# Altium PCB DominicMcNulty_Car_PCB_Group26.PcbDoc
Units mm, origin at the board's own origin, x right, y up, seen from the top; angles counter-clockwise.
Board outline 64 x 85 mm, 4 copper layers (Top Layer, Ground Plane, Power Plane, Bottom Layer), stack 0.844 mm thick; 98 components, 60 nets, 296 pads, 64 vias.
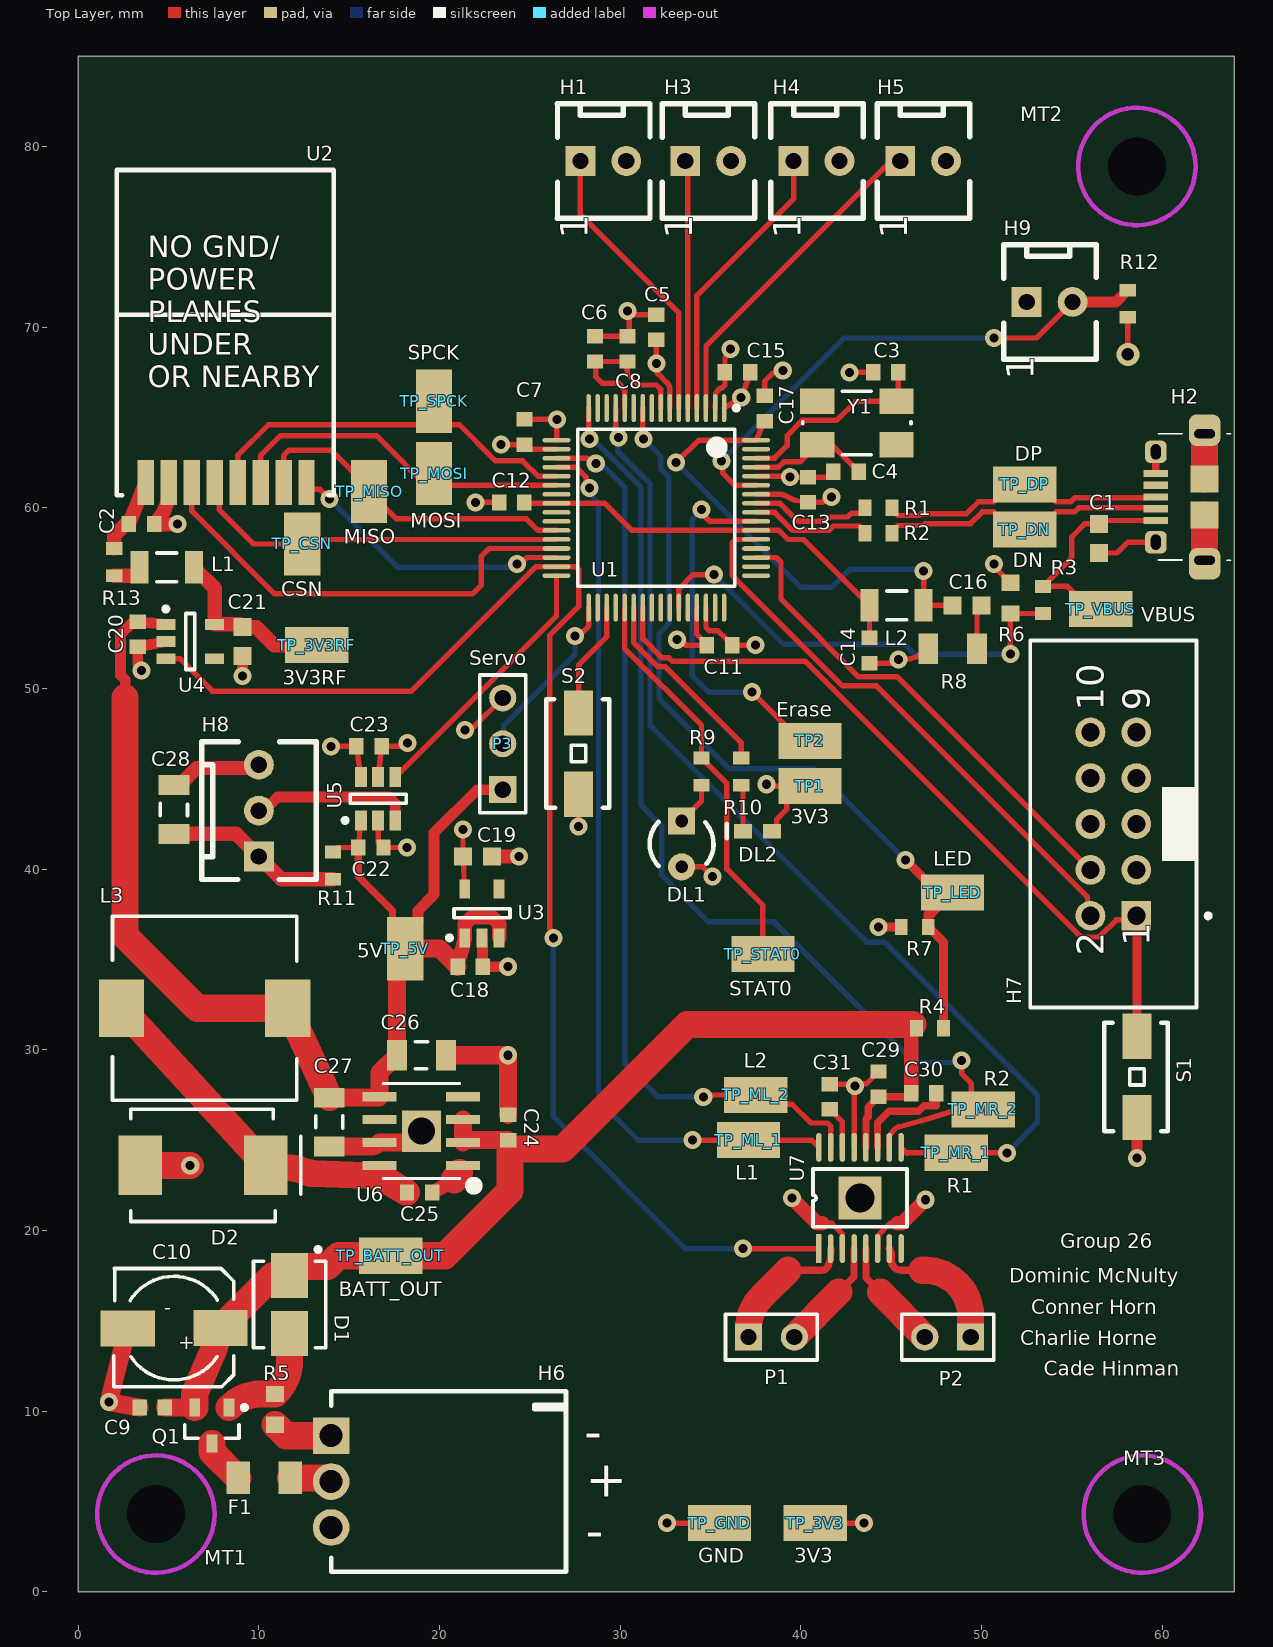
[diagram p0: Top Layer view]
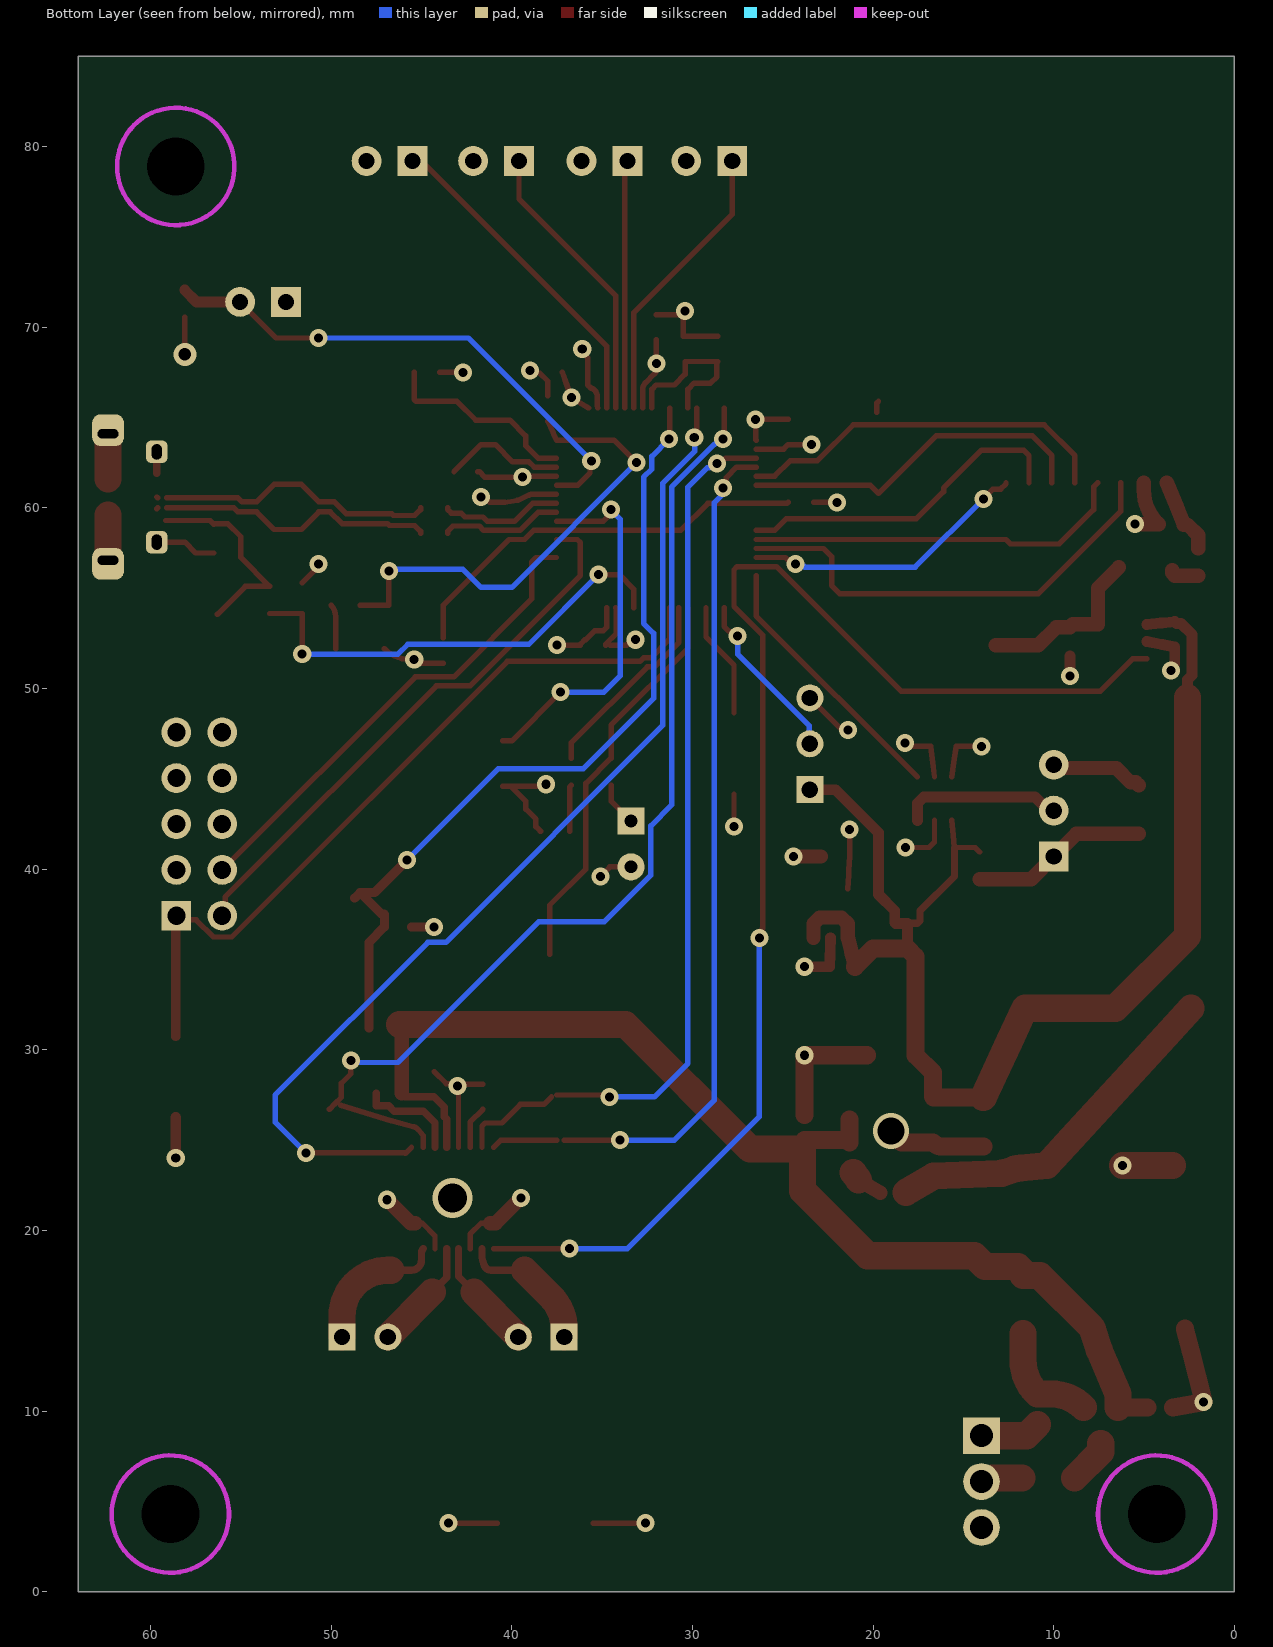
[diagram p1: Bottom Layer view, seen from below]
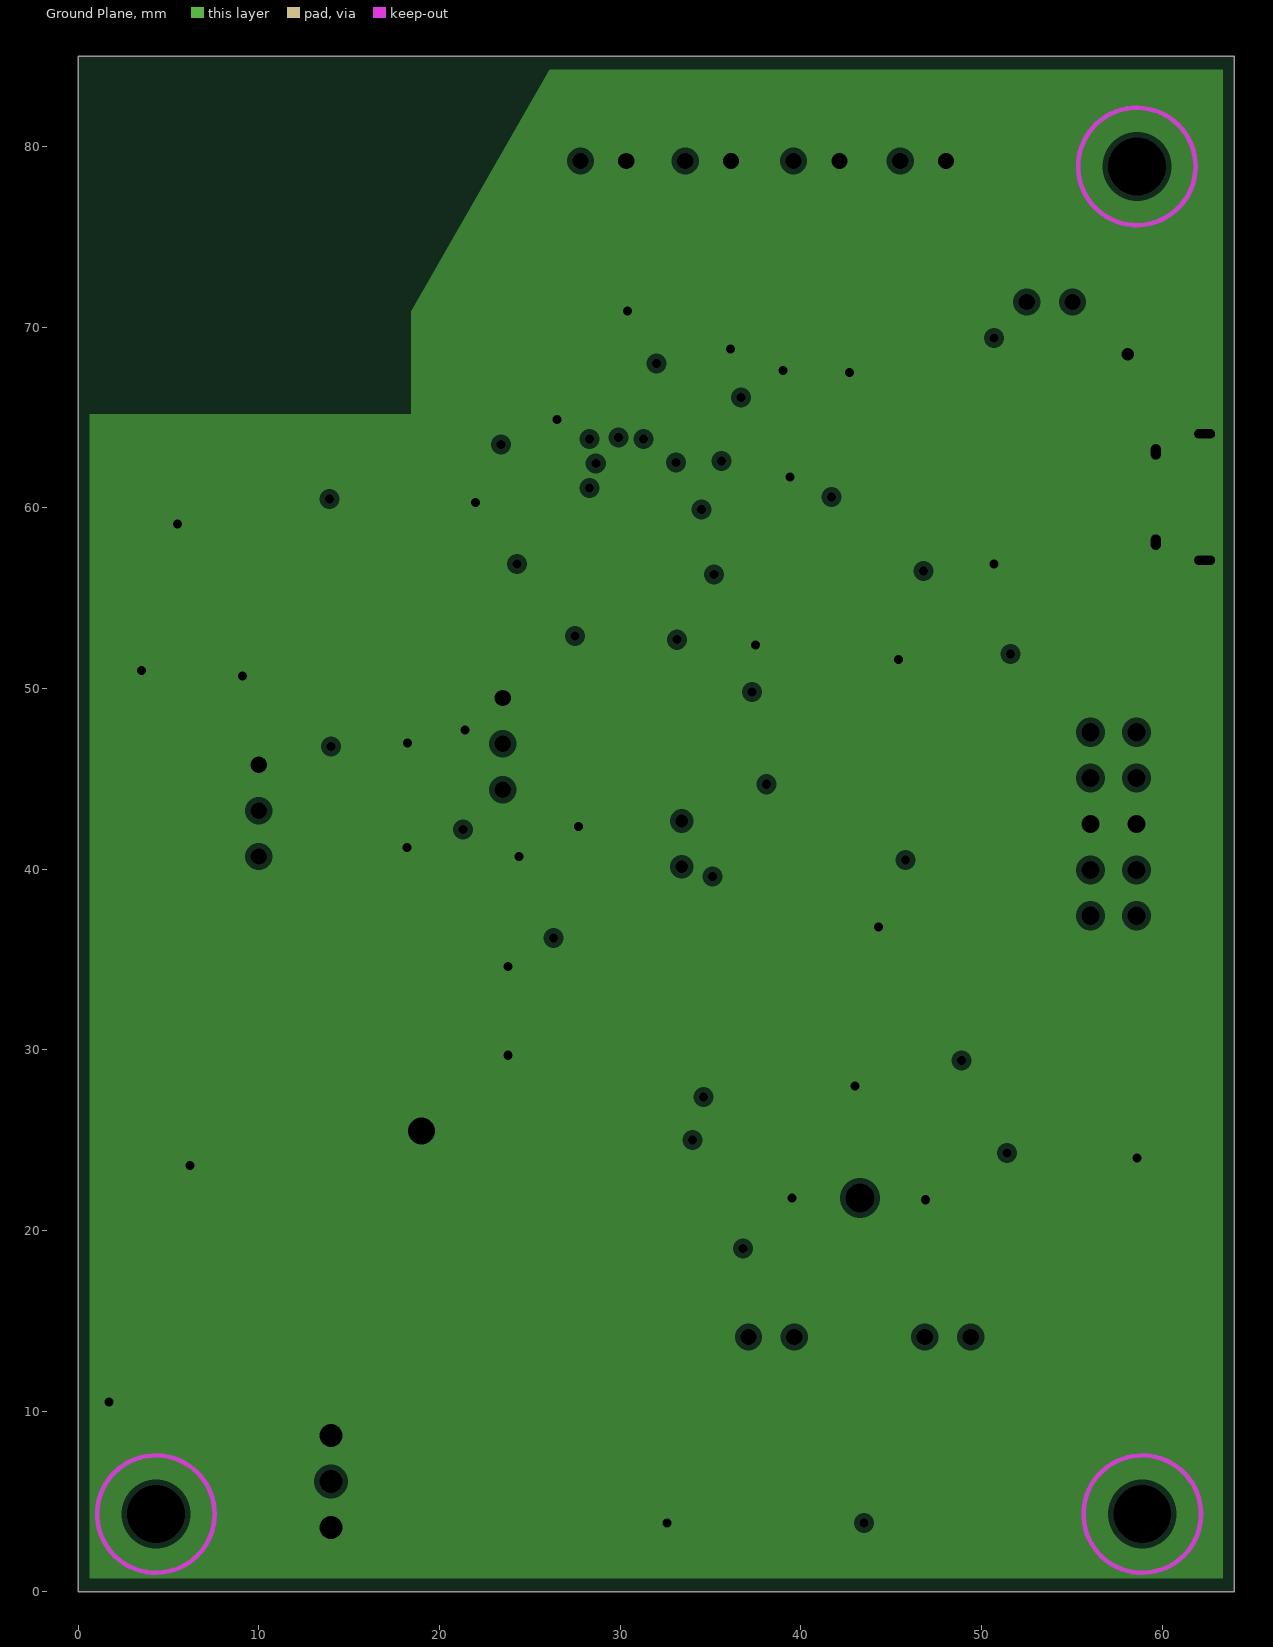
[diagram p2: Ground Plane, clearances drawn from the general rule]
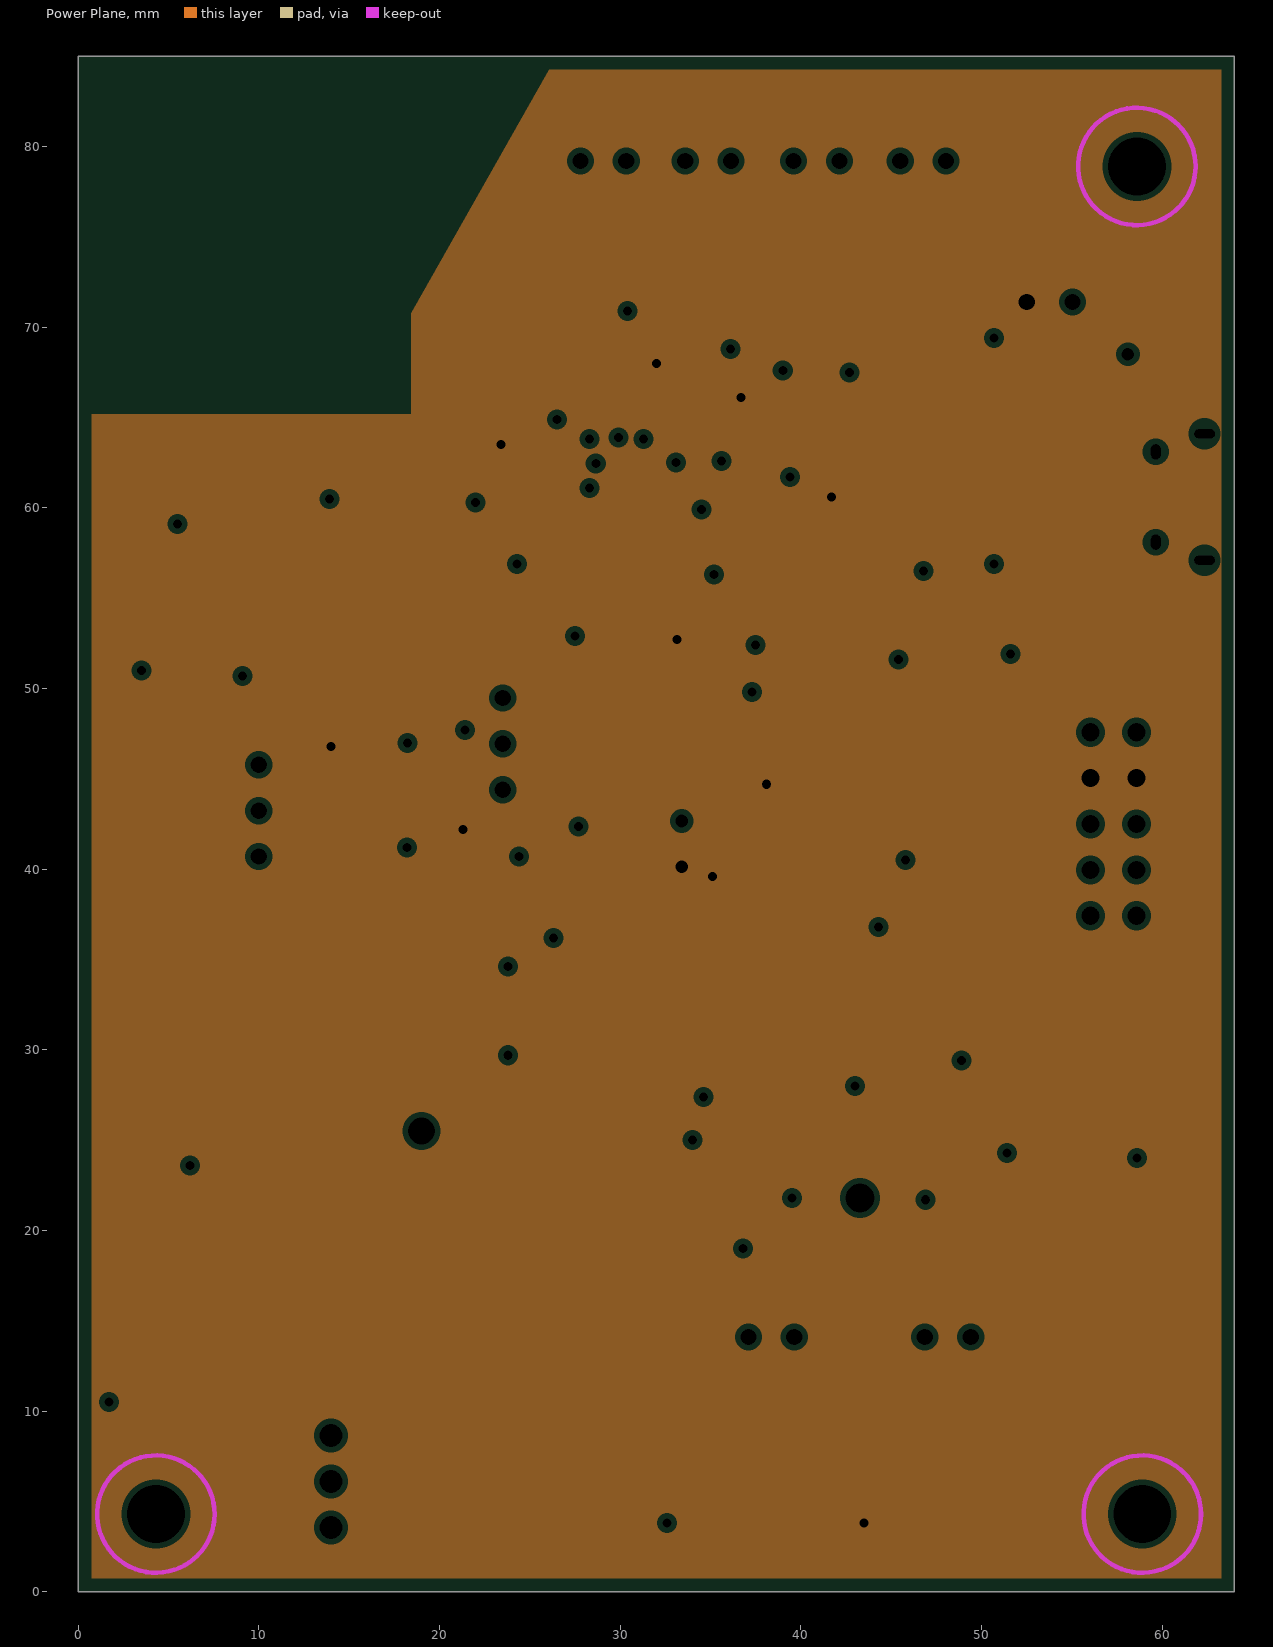
[diagram p3: Power Plane, clearances drawn from the general rule]

## Layer stack, top to bottom
Top Solder: solder mask 0.0102, Solder Resist, Dk 3.5
Top Layer: signal copper 0.0356
Dielectric 1: core 0.32, FR-4, Dk 4.8
Ground Plane: plane copper 0.036, net GND
Dielectric 3: prepreg 0.127, Dk 4.2
Power Plane: plane copper 0.036, net 3V3
Dielectric 4: core 0.254, Dk 4.2
Bottom Layer: signal copper 0.0356
Bottom Solder: solder mask 0.0102, Solder Resist, Dk 3.5

## Board outline
0,85 64,85 64,0 0,0 0,85

## Design rules (kind name [scope] priority, off if disabled: settings)
BoardOutlineClearance [All] p1: gap=0.5 ignorepadtopadclearanceinfootprint=FALSE
Clearance GND_POLY [InNamedPolygon('GND')] p1: gap=0.254 ignorepadtopadclearanceinfootprint=FALSE
Clearance Min_Clearance_Circuit_Labs [All] p2: gap=0.2 ignorepadtopadclearanceinfootprint=FALSE
DiffPairsRouting [All] p1: maxlimit=0.254 minlimit=0.2 mostfreqgap=0.254 toplayer_minwidth=0.254 toplayer_maxwidth=0.381 toplayer_prefwidth=0.381 bottomlayer_minwidth=0.254 bottomlayer_maxwidth=0.381 bottomlayer_prefwidth=0.381 maxuncoupledlength=12.7
FanoutControl Fanout_BGA [IsBGA] p1 off: bgadir=Out bgaviamode=Centered fanoutstyle=Auto fanoutdirection=Alternating viagrid=0.025 // Fanout_BGA (Default Rule)
Height [All] p1: minheight=0 maxheight=50.8 prefheight=12.7
HoleSize [All] p1: absolutevalues=TRUE maxlimit=10 minlimit=0.3 maxpercent=80.000 minpercent=20.000
MinimumAnnularRing [All] p1: minimumring=0.1
MinimumSolderMaskSliver [All] p1: minsoldermaskwidth=0.102
NetAntennae [All] p1: netantennaetolerance=1
PlaneClearance [All] p1: clearance=0.305
PlaneConnect [All] p1: planeconnectstyle=Direct reliefexpansion=0.508 reliefentries=4 reliefconductorwidth=0.254 reliefairgap=0.254
PolygonConnect [All] p1: connectstyle=Relief reliefconductorwidth=0.305 reliefentries=4 polygonreliefangle="90 Angle" airgapwidth=0.254
RoutingVias [All] p1: holewidth=0.5 width=1 viastyle="Through Hole" minholewidth=0.3 minwidth=0.8 maxholewidth=1 maxwidth=2
SMDNeckDown [All] p1 off: percent=50.000
SMDToCorner [All] p1: distance=98425
SMDToPlane [All] p1: distance=1968504
SilkToSolderMaskClearance SilkscreenOverComponentPads [IsPad] p1: minsilkscreentomaskgap=0.2 clearancetoexposedcopper=TRUE
SolderMaskExpansion [All] p1: expansion=0.102 istentingtop=FALSE
ViasUnderSMD [All] p1: allowed=FALSE
Width [All] p1: maxlimit=2 minlimit=0.2 preferedwidth=0.3
21 further rules are at their usual default settings.

## Classes and differential pairs
component class Schematic_Car_Secondary: C29 C30 C31 H9 P1 P2 P3 R12 TP_3V3 TP_3V3RF TP_5V TP_BATT_OUT TP_CSN TP_DN TP_DP TP_GND TP_LED TP_MISO TP_ML_1 TP_ML_2 TP_MOSI TP_MR_1 TP_MR_2 TP_SPCK TP_STAT0 TP_VBUS U7
component class Schematic_Car_Main: C1 C2 C3 C4 C5 C6 C7 C8 C9 C10 C11 C12 C13 C14 C15 C16 C17 C18 C19 C20 C21 C22 C23 C24 C25 C26 C27 C28 D1 D2 DL1 DL2 F1 H1 H2 H3 H4 H5 H6 H7 H8 L1 L2 L3 MT1 MT2 MT3 Q1 R1 R2 R3 R4 R5 R6 R7 R8 R9 R10 R11 R13 S1 S2 TP1 TP2 U1 U2 U3 U4 U5 U6 Y1
differential pair D: +D_P -D_N

## Components (designator, comment, footprint, x,y, rotation, side; value= is the part's Value field where it differs from the comment)
C1 "4.7uF" CAPC1608N 56.5,58.3 r270 top
C2 "10uF" CAPC1608L 3.5,59.1 r180 top
C3 "27pF" CAPC1608L 44.7,67.5 r0 top
C4 "27pF" CAPC1608L 42.5,62 r0 top
C5 "100nF" CAPC1608L 32,70 r270 top
C6 "100nF" CAPC1608L 28.6,68.8 r270 top
C7 "100nF" CAPC1608L 24.7,64.2 r270 top
C8 "100nF" CAPC1608L 30.4,68.8 r270 top
C9 "100nF" CAPC1608L 4.1,10.2 r0 top
C10 "100uF/16V" NICH-1 5.3,14.6 r0 top
C11 "100nF" CAPC1608L 35.5,52.4 r180 top
C12 "100nF" CAPC1608L 24,60.3 r0 top
C13 "100nF" CAPC1608L 40.4,61 r270 top
C14 "100nF" CAPC1608L 43.8,52.1 r90 top
C15 "100nF" CAPC1608L 36.5,67.5 r0 top
C16 "4.7uF" CAPC1608N 49.2,54.6 r180 top
C17 "100nF" CAPC1608L 38,65.5 r270 top
C18 "1uF" CAPC1608L 21.7,34.6 r180 top
C19 "4.7uF" CAPC1608N 22.1,40.7 r180 top
C20 "1uF" CAPC1608L 3.3,53 r90 top
C21 "4.7uF" CAPC1608N 9.1,52.6 r90 top
C22 "1uF" CAPC1608L 16.2,41.2 r180 top
C23 "1uF" CAPC1608L 16.1,46.8 r180 top
C24 "10uF" CAPC1608L 23.8,25.7 r270 top
C25 "100nF" CAPC1608L 18.9,22.1 r0 top
C26 "22uF" CAPC3216L 19,29.7 r180 top
C27 "22uF" CAPC3216L 13.9,26 r90 top
C28 "22uF" CAPC3216L 5.3,43.3 r270 top
C29 "10uF" CAPC1608L 44.3,28.1 r90 top
C30 "10nF" CAPC1608L 46.8,27.6 r180 top
C31 "2.2uF" CAPC1608L 41.6,27.4 r270 top
D1 "DIODE ZENER 5.6V" DO-214AA_SCL 11.7,15.9 r270 top
D2 "MBRS330T3G 30V 4A" SMC 6.9,23.6 r0 top
DL1 "DL_LED3mm" LED3MMTH 33.4,41.4 r270 top
DL2 "Green" WL-SMCW0603 36.8,42.1 r0 top
F1 "5A" RESC3216N 10.3,6.3 r180 top
H1 "2 Pin Molex KK HDR" MOLEX_KK_2_HDR 27.8,79.2 r0 top
H2 "JS_USB_MICRO_B" FCI_USB_10118194-0001LF 63.8,60.6 r90 top
H3 "2 Pin Molex KK HDR" MOLEX_KK_2_HDR 33.6,79.2 r0 top
H4 "2 Pin Molex KK HDR" MOLEX_KK_2_HDR 39.6,79.2 r0 top
H5 "2 Pin Molex KK HDR" MOLEX_KK_2_HDR 45.5,79.2 r0 top
H6 "Battery_HEADER_3pin" BATT_HEADER_3POS 14,6.1 r270 top
H7 "Header 5X2 Vert" IDC2.54-V10D 57.3,42.5 r90 top
H8 "3 Pin Molex KK Hdr" MOLEX_KK_3_HDR 10,40.7 r90 top
H9 "2 Pin Molex KK HDR" MOLEX_KK_2_HDR 52.5,71.4 r0 top
L1 "1A max, Idc 0.3R," INDC3216L 4.9,56.7 r0 top
L2 "1A max, Idc 0.3R," INDC3216L 45.3,54.6 r180 top
L3 "IND 5.2UH 6A" INDUCTOR5u2 7,32.3 r0 top
MT1 "M3.2 NPTH" MNT-HOLE_3.2mm_NPTH 4.3,4.3 r0 top
MT2 "M3.2 NPTH" MNT-HOLE_3.2mm_NPTH 58.6,78.9 r0 top
MT3 "M3.2 NPTH" MNT-HOLE_3.2mm_NPTH 58.9,4.3 r0 top
P1 "JA_PIN_Header 2" HDR1X2 37.1,14.1 r0 top
P2 "JA_PIN_Header 2" HDR1X2 49.4,14.1 r180 top
P3 "Servo" HDR1X3 23.5,44.4 r90 top
Q1 "SSM3J328R,LF" SOT23_L 7.4,9.2 r270 top
R1 "27R" RESC1608L 44.3,60 r180 top
R2 "27R" RESC1608L 44.3,58.6 r180 top
R3 "27K" RESC1608L 53.4,54.9 r90 top
R4 "300K" RESC1608L 47.15,31.2 r180 top
R5 "47K" RESC1608N 10.9,10.1 r90 top
R6 "47K" RESC1608N 51.6,55 r270 top
R7 "220K" RESC1608L 46.3,36.8 r0 top
R8 "1R" RESC3216L 48.4,52.2 r0 top
R9 "3K" RESC1608L 34.5,45.4 r90 top
R10 "2K" RESC1608L 36.7,45.4 r90 top
R11 "0R" RESC1608L 14.1,40.2 r90 top
R12 "100K" RESC1608L 58.1,71.3 r90 top
R13 "10R" RESC1608L 2,57 r270 top
S1 "EVQPNF05M" EVQPNF05M 58.6,28.5 r90 top
S2 "EVQPNF05M" EVQPNF05M 27.7,46.4 r90 top
TP1 "3V3" TP_1206 40.5,44.6 r0 top value=TP
TP2 "Erase" TP_1206 40.5,47.1 r0 top value=TP
TP_3V3 "3V3" TP_1206 40.8,3.8 r180 top value=TP
TP_3V3RF "3V3RF" TP_1206 13.2,52.4 r180 top value=TP
TP_5V "5V" TP_1206 18.1,35.6 r90 top value=TP
TP_BATT_OUT "BATT_OUT" TP_1206 17.3,18.6 r180 top value=TP
TP_CSN "CSN" TP_1206 12.4,58 r270 top value=TP
TP_DN "DN" TP_1206 52.4,58.8 r180 top value=TP
TP_DP "DP" TP_1206 52.4,61.3 r180 top value=TP
TP_GND "GND" TP_1206 35.5,3.8 r180 top value=TP
TP_LED "LED" TP_1206 48.4,38.7 r180 top value=TP
TP_MISO "MISO" TP_1206 16.1,60.9 r270 top value=TP
TP_ML_1 "L1" TP_1206 37.1,25 r0 top value=TP
TP_ML_2 "L2" TP_1206 37.5,27.5 r0 top value=TP
TP_MOSI "MOSI" TP_1206 19.7,61.9 r270 top value=TP
TP_MR_1 "R1" TP_1206 48.6,24.3 r0 top value=TP
TP_MR_2 "R2" TP_1206 50.1,26.7 r0 top value=TP
TP_SPCK "SPCK" TP_1206 19.7,65.9 r270 top value=TP
TP_STAT0 "STAT0" TP_1206 37.9,35.3 r180 top value=TP
TP_VBUS "VBUS" TP_1206 56.6,54.4 r180 top value=TP
U1 "ATSAM4S8BA-ANR" LQFP64_L 32,60 r270 top locked
U2 "nRF24 SMD" NRF24 2.143,60.7 r0 top
U3 "CAT6219-330TDGT3" SOT95P280X145-5N 22.35,37.55 r90 top
U4 "CAT6219-330TDGT3" SOT95P280X145-5N 6.2,52.6 r0 top
U5 "SN74LVC1T45" SOT23-6_N 16.6,43.9 r90 top
U6 "ADP2302ARDZ-5.0 BUCK" RD_8_1 19,25.5 r180 top locked value=Value
U7 "DRV8833" "HTSOP16 DRV8833" 41,19 r90 top locked
Y1 "12MHz" 6.0X3.5-4 43.1,64.7 r0 top

## Footprints (in the part's own frame and the unit in brackets; to place one, negate y for a bottom-side part, rotate by r counter-clockwise, add the part's x,y. Pads: shape width x height; smd on the part's side, far side on the other; paste and mask are expansions set on the pad)
6.0X3.5-4 [mm] "4 SMD 6.0X3.5 mm No Lead Crystal"
  rect 1.9x1.4 smd: 1(-2.2,-1.2) 2(2.2,-1.2) 3(2.2,1.2) 4(-2.2,1.2)
  silkscreen extent -3,-1.75 3,1.75, body extent -3,-1.75 3,1.75, height 1.2
BATT_HEADER_3POS [mil]
  rect 80x80 hole 50: 1(-100,0)
  round 80 hole 50: 2(0,0) 3(100,0)
  silkscreen extent -197,0 197,512, body extent -197,-31 200,504, height 294
CAPC1608L [mm] "Chip Capacitor, Body 1.6x0.8mm, IPC High Density"
  rect 0.8x0.9 smd: 1(-0.7,0) 2(0.7,0)
  body extent -0.87,-0.48 0.87,0.48, height 0.85
CAPC1608N [mm] "Chip Capacitor, Body 1.6x0.8mm, IPC Medium Density"
  rect 1x1 smd: 1(-0.8,0) 2(0.8,0)
  body extent -0.87,-0.48 0.87,0.48, height 0.85
CAPC3216L [mm] "Chip Capacitor, Body 3.2x1.6mm, IPC High Density"
  rect 1.1x1.7 smd: 1(-1.35,0) 2(1.35,0)
  silkscreen extent -0.35,-0.75 0.35,0.75, body extent -1.7,-0.9 1.7,0.9, height 1.35
DO-214AA_SCL [mm] "Molded Diode, 2-Leads, Body 4.40x3.62mm, IPC Medium Density"
  rect 2.5x2.05 smd: 1(-1.6,0) 2(1.6,0)
  silkscreen extent -3.17,-2 2.4,2
EVQPNF05M [mm] "Panansonic light touch SMD push button switch"
  rect 2.5x1.6 smd: 1(-2.25,0) 2(2.25,0)
  silkscreen extent -3,-1.7 3,1.8, body extent -3,-1.7 3,1.8, height 5
FCI_USB_10118194-0001LF [mm] "Micro USB B Type Receptacle"
  rect 0.4x1.35 smd mask+0.07: 1(-1.3,4.15) 2(-0.65,4.15) 3(0,4.15) 4(0.65,4.15) 5(1.3,4.15)
  rrect50% 1.75x1.75 hole 0.5 slot 1.15 at 90 deg copper offset -0.2,0 paste-2539.97 mask+0.1: 6(-3.5,1.45)
  rrect50% 1.25x1.2 hole 0.55 slot 0.85 at 0 deg: 6(-2.5,4.15) 6(2.5,4.15)
  rect 1.5x1.55 smd: 6(-1,1.45) 6(1,1.45)
  rrect50% 1.75x1.75 hole 0.5 slot 1.15 at 90 deg copper offset 0.2,0 paste-2539.97 mask+0.1: 6(3.5,1.45)
  silkscreen extent -3.5,0 3.5,4
HDR1X2 [mm] "Connector; Header; 2 Position"
  rect 1.5x1.5 hole 0.9: 1(0,0)
  round 1.5 hole 0.9: 2(2.54,0)
  silkscreen extent -1.27,-1.27 3.81,1.27, body extent -1.25,-1.25 3.79,1.25, height 8.54
HDR1X3 [mm] "Connector; Header; 3 Position"
  rect 1.5x1.5 hole 0.9: 1(0,0)
  round 1.5 hole 0.9: 2(2.54,0) 3(5.08,0)
  silkscreen extent -1.27,-1.27 6.35,1.27, body extent -1.27,-1.27 6.35,1.27, height 8.89
"HTSOP16 DRV8833" [mm]
  rect 1.6x0.3 smd: 1(0,0)
  oval 1.6x0.3 smd: 2(0,-0.65) 3(0,-1.3) 4(0,-1.95) 5(0,-2.6) 6(0,-3.25) 7(0,-3.9) 8(0,-4.55) 9(5.6,-4.55) 10(5.6,-3.9) 11(5.6,-3.25) 12(5.6,-2.6) 13(5.6,-1.95) 14(5.6,-1.3) 15(5.6,-0.65) 16(5.6,0)
  rect 2.4x2.4 smd: 17(2.8,-2.275)
  silkscreen extent 1.2,-4.88 4.4,0.33, body extent -0.4,-4.77 6,0.23, height 1.13
IDC2.54-V10D [mm] "Connector; IDC, Low Profile Male Header, Thru-Hole; 10 Position; Vertical; Pitch 2.54 mm; Body 20.32 x 9.2 x 9.45 mm (LxWxH)"
  rect 1.65x1.65 hole 1: 1(-5.08,-1.27)
  round 1.65 hole 1: 2(-5.08,1.27) 3(-2.54,-1.27) 4(-2.54,1.27) 5(0,-1.27) 6(0,1.27) 7(2.54,-1.27) 8(2.54,1.27) 9(5.08,-1.27) 10(5.08,1.27)
  silkscreen extent -10.16,-5.38 10.16,4.6, body extent -10.16,-4.6 10.16,4.6, height 9.45
INDC3216L [mm] "Chip Inductor, Body 3.2x1.6mm, IPC High Density"
  rect 1x1.8 smd: 1(-1.5,0) 2(1.5,0)
  silkscreen extent -0.55,-0.8 0.55,0.8, body extent -1.75,-0.95 1.75,0.95, height 1.9
INDUCTOR5u2 [mm]
  rect 2.5x3.2 smd: 1(-4.6,0) 2(4.6,0)
  silkscreen extent -5.1,-5.1 5.1,5.1, body extent -5,-5 5,5, height 3.8
LED3MMTH [mm] "LED 3 mm Through Hole"
  rect 1.5x1.5 hole 0.7: 1(-1.27,0)
  round 1.5 hole 0.7: 2(1.27,0)
  silkscreen extent -1.22,-1.77 1.22,1.77
LQFP64_L [mm] "Thin QFP, 64-Leads, Body 10x10mm, Pitch 0.5mm, IPC High Density"
  oval 1.55x0.25 smd mask+0.07: 1(-5.525,3.75) 2(-5.525,3.25) 3(-5.525,2.75) 4(-5.525,2.25) 5(-5.525,1.75) 6(-5.525,1.25) 7(-5.525,0.75) 8(-5.525,0.25) 9(-5.525,-0.25) 10(-5.525,-0.75) 11(-5.525,-1.25) 12(-5.525,-1.75) 13(-5.525,-2.25) 14(-5.525,-2.75) 15(-5.525,-3.25) 16(-5.525,-3.75) 33(5.525,-3.75) 34(5.525,-3.25) 35(5.525,-2.75) 36(5.525,-2.25) 37(5.525,-1.75) 38(5.525,-1.25) 39(5.525,-0.75) 40(5.525,-0.25) 41(5.525,0.25) 42(5.525,0.75) 43(5.525,1.25) 44(5.525,1.75) 45(5.525,2.25) 46(5.525,2.75) 47(5.525,3.25) 48(5.525,3.75)
  oval 0.25x1.55 smd mask+0.07: 17(-3.75,-5.525) 18(-3.25,-5.525) 19(-2.75,-5.525) 20(-2.25,-5.525) 21(-1.75,-5.525) 22(-1.25,-5.525) 23(-0.75,-5.525) 24(-0.25,-5.525) 25(0.25,-5.525) 26(0.75,-5.525) 27(1.25,-5.525) 28(1.75,-5.525) 29(2.25,-5.525) 30(2.75,-5.525) 31(3.25,-5.525) 32(3.75,-5.525) 49(3.75,5.525) 50(3.25,5.525) 51(2.75,5.525) 52(2.25,5.525) 53(1.75,5.525) 54(1.25,5.525) 55(0.75,5.525) 56(0.25,5.525) 57(-0.25,5.525) 58(-0.75,5.525) 59(-1.25,5.525) 60(-1.75,5.525) 61(-2.25,5.525) 62(-2.75,5.525) 63(-3.25,5.525) 64(-3.75,5.525)
  silkscreen extent -5.65,-4.35 4.35,4.55, body extent -5,-5 5,5, height 1.6
MNT-HOLE_3.2mm_NPTH [mm] "Mounting Hole 3.2mm non plated"
  round 0 hole 3.2 unplated: 1(0,0)
  Keep-Out Layer circle w0.254: c0,0 r3.25
MOLEX_KK_2_HDR [mil] "MOLEX_KK_2_HDR"
  rect 65x65 hole 35.43: 1(0,0)
  round 65 hole 35.43: 2(100,0)
  silkscreen extent -50,-125 152,125, body extent -42,-124 152,126, height 420
MOLEX_KK_3_HDR [mil] "MOLEX_KK_3_HDR"
  rect 65x65 hole 35.43: 1(0,0)
  round 65 hole 35.43: 2(100,0) 3(200,0)
  silkscreen extent -50,-125 250,125, body extent -50,-114 250,114, height 461
NICH-1 [mm] "Electrolytic capacitor"
  rect 3x2 smd: 1(-2.561,-0.022) 2(2.584,0.011)
  silkscreen extent -3.34,-3.25 3.3,3.3, body extent -3.2,-3.2 3.2,3.2, height 5.3
NRF24 [mm]
  rect 0.9x2.5 smd: 1(1.6,0.7) 2(2.871,0.7) 3(4.143,0.7) 4(5.414,0.7) 5(6.686,0.7) 6(7.957,0.7) 7(9.229,0.7) 8(10.5,0.7)
  silkscreen extent 0,0 12,18, body extent 0,0 12,18, height 2.27
RD_8_1 [mil]
  rect 74x20 smd paste+0 mask+0: 1(-91,75) 2(-91,25) 3(-91,-25) 4(-91,-75) 5(91,-75) 6(91,-25) 7(91,25) 8(91,75)
  rect 84.65x90 smd paste-44.5 mask+0: EPAD(0,0)
  silkscreen extent -118,-104 84,123, body extent 0,0 10,10, height 10
RESC1608L [mm] "Chip Resistor, Body 1.6x0.8mm, IPC High Density"
  rect 0.7x0.9 smd: 1(-0.75,0) 2(0.75,0)
  body extent -0.85,-0.48 0.85,0.48, height 0.9
RESC1608N [mm] "Chip Resistor, Body 1.6x0.8mm, IPC Medium Density"
  rect 0.9x1 smd: 1(-0.85,0) 2(0.85,0)
  body extent -0.85,-0.48 0.85,0.48, height 0.6
RESC3216L [mm] "Chip Resistor, Body 3.1x1.6mm, IPC High Density"
  rect 1.1x1.7 smd: 1(-1.35,0) 2(1.35,0)
  body extent -1.68,-0.87 1.68,0.87, height 2.54
RESC3216N [mm] "Chip Resistor, Body 3.2x1.6mm, IPC Medium Density"
  rect 1.3x1.8 smd: 1(-1.45,0) 2(1.45,0)
  body extent -1.68,-0.87 1.68,0.87, height 0.71
SMC [mm] "DO-214-AB/SMC; 2 C-Bend Leads; Body 7.9 x 5.9 mm, inc. leads (LxW)"
  rect 2.4x3.3 smd: 1(-3.475,0) 2(3.475,0)
  silkscreen extent -4,-3.1 5.43,3.1, body extent -4.22,-2.95 3.72,2.95, height 2.27
SOT23-6_N [mm]
  rect 1.1x0.65 smd: 1(-1.2,0.95) 2(-1.2,0) 3(-1.2,-0.95) 4(1.2,-0.95) 5(1.2,0) 6(1.2,0.95)
  silkscreen extent -1.32,-1.55 0.25,1.95, body extent -0.9,-1.55 0.9,1.55, height 1.45
SOT23_L [mm] "SOT23, 3-Leads, Body 2.9x1.3mm, Pitch 0.95mm, Lead Span 2.3mm, IPC High Density"
  rect 1x0.6 smd: 1(-1,0.95) 2(-1,-0.95) 3(1,0)
  silkscreen extent -1.12,-1.5 0.7,1.93, body extent -0.7,-1.5 0.7,1.5, height 1.1
SOT95P280X145-5N [mm] "SOT23, 5-Leads, Body 2.90x2.80mm, Pitch 0.95mm, IPC Medium Density"
  rect 1.05x0.6 smd: 1(-1.35,0.95) 2(-1.35,0) 3(-1.35,-0.95) 4(1.35,-0.95) 5(1.35,0.95)
  silkscreen extent -1.47,-1.55 0.25,1.92, body extent -0.87,-1.52 0.87,1.53, height 1.45
TP_1206 [mm] "Test Point Pad"
  rect 3.5x2 smd: 1(0,0)
  body extent -1.62,-0.85 1.63,0.8, height 2
WL-SMCW0603 [mm] "2.4 x 0.8 x 0.7mm LED"
  rect 1x0.8 smd: 1(0,0) 2(1.6,0)
  silkscreen extent -0.9,-0.4 -0.9,0.4

## Part data
C1 C16 C19 C21: library part CC_4.7uF_0603, "CAP CER 4.7uF X5R +-20%  10V 0603", Max Voltage=10V, Code_IPC=2012[0805], Note="Footprint corresponds to dimensions for bulk cassette packaging. This case size has tightened tolerances.", PackageReference=0805, Storage Location="PCB Assembly WS", Supplier="ECE Dept"
C2 C24 C29: library part CC_10uF_0603, "CAP CER 10UF X5R +-20% 6V3 0603", Voltage - Rated=6.3V, Storage Location="PCB Assembly WS", Supplier="ECE Dept"
C3 C4: library part CC_27pF_0603, "CAP CER 27pF NPO/COG +-5% 50V 0603", Code_IPC="1608 [0603]", PackageReference=0603, Storage Location="PCB Assembly WS", Supplier="ECE Dept"
C5 C6 C7 C8 C9 C11 C12 C13 C14 C15 C17 C25: library part CC_100nF_0603, "CAP CER 100nF X7R +-10% 50V 0603", Code_IPC="1608 [0603]", PackageReference=0603, Storage Location="PCB Assembly WS", Supplier="ECE Dept"
C10: library part CA_100uF_16V, "CAP ALUM 100uF 16V SMD", Manufacturer=Nichcon, Manufacturer PN=UWX1C101MCL1GB, Supplier Part Number 1=1870677, Storage Location="PCB Assembly WS", Supplier="ECE Dept", Supplier 1=Farnell, Supplier 2=Digi-Key, Supplier Part Number 2=493-2105-1-ND
C18 C20 C22 C23: library part CC_1uF_0603, "CAP CER 1uF Y5V -20% +80% 16V 0603", Max Voltage=16V, Code_IPC="1608 [0603]", PackageReference=0603, Storage Location="PCB Assembly WS", Supplier="ECE Dept"
C26 C27 C28: library part CC_22uF_1206, "CAP CER 22uF Y5V -20% +80% 10V 1206", Dielectric=Y5V, Max Voltage=10V, Storage Location="PCB Assembly WS", Supplier="ECE Dept"
C30: library part CC_10nF_0603, "CAP CER 10nF X7R +-10% 50V 0603", Code_IPC="1608 [0603]", PackageReference=0603, Storage Location="PCB Assembly WS", Supplier="ECE Dept"
C31: library part CC_2.2uF_0603, "CAP CER 2.2uF X5R +-20% 10V 0603", Max Voltage=10V, Code_IPC="1608 [0603]", PackageReference=0603, Storage Location="PCB Assembly WS", Supplier="ECE Dept"
D1: library part SMBJ5339B-TP, "DIODE ZENER 5.6V 5W DO214AA", Base Part Number=SMBJ5339, Manufacturer="Micro Commercial Co", Operating Temperature="-55°C ~ 150°C", Package / Case="DO-214AA, SMB", Supplier Device Package="DO-214AA (SMB)", Supplier Part Number 1=SMBJ5339B-TPMSCT-ND, Tolerance=±5%, Category="Discrete Semiconductor Products", ComponentLink1Description=http://www.mccsemi.com/up_pdf/SMBJ5338B-SMBJ5388B(SMB).pdf, ComponentLink1URL=http://www.mccsemi.com/up_pdf/SMBJ5338B-SMBJ5388B(SMB).pdf, Manufacturer Part Number=SMBJ5339B-TP, Mounting Type="Surface Mount", Packaging="Cut Tape (CT)", Part Status=Active, Pricing 1="1=1.47, 10=1.277, 25=1.1312, 100=0.9853, 250=0.85764, 500=0.72988, 1000=0.58391 (NZD)", RoHS="RoHS Compliant", Stock 1=85990, Supplier 1=Digi-Key
D2: library part MBRS330T3G, "SCHOTTKY  30V 4A", Base Part Number=MBRS330, Capacitance @ Vr, F=-, Current - Average Rectified (Io)=4A, Manufacturer="ON Semiconductor", Operating Temperature - Junction="-65°C ~ 150°C", Package / Case="DO-214AB, SMC", Supplier Device Package=SMC, Supplier Part Number 1=MBRS330T3GOSCT-ND, Category="Discrete Semiconductor Products", ComponentLink1Description=http://www.onsemi.com/pub/Collateral/MBRS340T3-D.PDF, ComponentLink1URL=http://www.onsemi.com/pub/Collateral/MBRS340T3-D.PDF, Diode Type=Schottky, Manufacturer Part Number=MBRS330T3G, Mounting Type="Surface Mount", Packaging="Cut Tape (CT)", Part Status=Active, Pricing 1="1=0.93, 10=0.79, 100=0.5902, 500=0.46368, 1000=0.35829 (NZD)", RoHS="RoHS Compliant", Speed="Fast Recovery =< 500ns, > 200mA (Io)", Stock 1=8919, Supplier 1=Digi-Key
DL1: "LED 3mm Dia Thru Hole", Supplier Part Number 1=1497967, Storage Location="ECE Store", Supplier="ECE Dept", Supplier 1=Farnell
DL2: library part DL_150060GS75000, "LED Green 430mcd 0603 SMD", Forward Current If=30, Forward Voltage=3.2, Manufacturer="WURTH ELEKTRONIK", Manufacturer Part Number=150060GS75000, Supplier Part Number 1=2322070, LED Colour=Green, LED Mounting=SMD, Lens Shape=Rectangular, Luminous Intensity=430, Storage Location="PCB Assembly WS", Supplier="ECE Dept", Supplier 1=Farnell, Viewing Angle=140°, Wavelength Typ=520
F1: library part FS_Fuse_5.0A, "Fuse 5.0A Fast Acting 1206 SMD", Case Code (Imperial)=1206, Case Code (Metric)=3216, DC Cold Resistance=19mR, Manufacturer="Bel TRP", Manufacturer Part Number=C1F5, Max Operating Temperature=125°C, Min Operating Temperature=-55°C, Supplier Part Number 1=507-1886-1-ND, Voltage Rating=125V, Voltage Rating (DC)=63V, Approvals=CE,cURus, Case/Package=1206, ComponentLink1Description=http://www.farnell.com/datasheets/2571625.pdf, ComponentLink1URL=http://www.farnell.com/datasheets/2571625.pdf, ComponentLink2Description=http://belfuse.com/pdfs/C1F.pdf, ComponentLink2URL=http://belfuse.com/pdfs/C1F.pdf, ComponentLink3Description=http://www.mouser.com/ds/2/643/C1F-594910.pdf, ComponentLink3URL=http://www.mouser.com/ds/2/643/C1F-594910.pdf, ComponentLink4Description=https://belfuse.com/resources/StewartConnector/C1F.pdf, ComponentLink4URL=https://belfuse.com/resources/StewartConnector/C1F.pdf, Contact Plating=Nickel,Tin, Current Rating=5A, Fuse Type="Board Mount (Cartridge Style Excluded)", Length=0.126inch, Mount="Surface Mount", Number of Pins=2, Packaging="Tape and Reel", Pricing 1="1=0.32, 5=0.312, 10=0.298, 50=0.2662, 100=0.2479, 250=0.22032, 500=0.1836, 1000=0.17442 (USD)", Stock 1=725, Supplier 1=Digi-Key, Supplier 2=Element14, Supplier Part Number 2=2848595, Voltage Rating (AC)=125V, Width=0.062inch
H1 H3 H4 H5 H9: library part JA_MOLEX_KK_2POS, "CONN HEADER 2POS 2.54mm VERT_Thru Hole", Supplier Part Number 1=1462926, Storage Location="ECE Dept Store", Supplier="ECE Dept", Supplier 1=Farnell
H2: library part JS_USB_MICRO_B_SMT, "CONN USB MICRO B RECPT SMT R/A", Manufacturer=FCI, Manufacturer Part Number=10118194-0001LF, Supplier Part Number 1=609-4618-1-ND, Features="Shielded, Solder Retention", Gender=Receptacle, Mounting Type="Surface Mount, Right Angle, Horizontal", Number of Contacts=5, Specifications="USB 2.0", Supplier 1=Digi-Key
H6: "3Pin Header 2.54mm spacing / Digikey #WM22663-ND", Supplier Part Number 1=WM22663-ND, Supplier 1=Digi-Key
H7: library part JA_HDR_IDC_5X2_VERT, "IDC Header, 2,54mm, 10-Pin, Vert", Supplier Part Number 1=1096985, Storage Location="ECE Dept Store", Supplier="ECE Dept", Supplier 1=Farnell
H8: library part LED_Strip_Header, "CONN HEADER 3POS 2.54mm VERT_Thru Hole", Manufacturer=Molex, Manufacturer PN=22-23-2031, Supplier Part Number 1=9731156, Storage Location="ECE Dept Store", Supplier="ECE Dept", Supplier 1=Farnell
L1 L2: library part IN_Ferrite-Bead, "Ferrite Bead, Rdc 0.3R, Z100MHZ 600R, Imax 1A, SMD 1206", DC Current Rating=1, DC Resistance Max=0.08, Ferrite Case Style="1206 ^3216 Metric]", Frequency Range="50MHz to 1", Impedance Tolerance="± 25%", Manufacturer=FAIR-RITE, Manufacturer Part Number=2512066017Y1, Supplier Part Number 1=1612060, Ferrite Mounting=SMD, Impedance=600, Manufacturer PN=2512066017Y1, Storage Location="PCB Assembly WS", Supplier="ECE Dept", Supplier 1=Farnell
L3: library part CDRH104RNP-5R2NC, "FIXED IND 5.2UH 6A 22 MOHM SMD", Current - Saturation=5.6A, DC Resistance (DCR)="22 mOhm Max", Frequency - Self Resonant=-, Manufacturer="Sumida America Components Inc.", Operating Temperature="-40°C ~ 100°C", Package / Case=Nonstandard, Supplier Part Number 1=308-2280-1-ND, Tolerance=±30%, Category="Inductors, Coils, Chokes", ComponentLink1Description=http://products.sumida.com/products/pdf/CDRH104R.pdf, ComponentLink1URL=http://products.sumida.com/products/pdf/CDRH104R.pdf, Height - Seated (Max)="0.157\" (4.00mm)", Manufacturer Part Number=CDRH104RNP-5R2NC, Material - Core=Ferrite, Mounting Type="Surface Mount", Packaging="Cut Tape (CT)", Part Status=Active, Pricing 1="1=2.9, 10=2.678, 100=1.8743, 500=1.5173 (NZD)", Q @ Freq=-, Ratings=-, RoHS="RoHS Compliant", Shielding=Shielded, Size / Dimension="0.402\" L x 0.394\" W (10.20mm x 10.00mm)", Stock 1=3849, Supplier 1=Digi-Key, Supplier Device Package=-, Type=-
MT1 MT2 MT3: library part MC_M3.2_HOLE, "Fixing M3.2 Mount Hole NPTH", Manufacturer=Hi-Q, Manufacturer PN="3BV series M3 Clearance", Price=0, Supplier="ECE Dept"
P1 P2: "Header, 2-Pin", LatestRevisionDate=17-Jul-2002, LatestRevisionNote="Re-released for DXP Platform.", Publisher="Altium Limited"
P3: library part "JA_PIN_Header 3", "Header, 3-Pin", LatestRevisionDate=17-Jul-2002, LatestRevisionNote="Re-released for DXP Platform.", Publisher="Altium Limited"
Q1: library part TM_SSM3J328R, "MOSFET P-CH 20V 6A SOT23-3", Case/Package=SOT-23-3, Continuous Drain Current (ID)=6A, Drain to Source Breakdown Voltage=-20V, Drain to Source Resistance=47.4mR, Drain to Source Voltage (Vdss)=20V, Gate to Source Voltage (Vgs)=8V, Input Capacitance=840pF, Input Capacitance (Ciss) @ Vds="840pF @ 10V", Manufacturer=Toshiba, Max Operating Temperature=150°C, Max Power Dissipation=1W, Min Operating Temperature=-55°C, Package / Case="SOT-23-3 Flat Leads", Package Quantity=3000, Power Dissipation=2W, Supplier Device Package=SOT-23F, Supplier Part Number=SSM3J328RLFDKR-ND, ComponentLink1Description=https://datasheet.ciiva.com/11158/ssm3j328r-datasheet-en-20140301-11158652.pdf, ComponentLink1URL=https://datasheet.ciiva.com/11158/ssm3j328r-datasheet-en-20140301-11158652.pdf, Current - Continuous Drain (Id) @ 25° C=6A, Element Configuration=Single, FET Feature="Logic Level Gate, 1.5V Drive", FET Type="MOSFET P-Channel, Metal Oxide", Gate Charge (Qg) @ Vgs="12.8nC @ 4.5V", Manufacturer Part Number=SSM3J328R,LF, Mount="Surface Mount", Number of Channels=1, Number of Elements=1, Number of Pins=3, Packaging="Tape and Reel", Power - Max=1W, Pricing="1=0.79, 10=0.658, 25=0.5772, 100=0.4939, 250=0.42836, 500=0.36284, 1000=0.27972 (NZD)", Radiation Hardening=No, Rds On Max=29.8mR, Storage Location="PCB Assembly WS", Supplier=Digi-Key, Supplier 1=Digi-Key, Supplier Part Number 1=SSM3J328RLFDKR-ND, Turn-Off Delay Time=107ns, Turn-On Delay Time=32ns, Vgs(th) (Max) @ Id="1V @ 1mA"
R1 R2: library part RS_27R, "RES 27 OHM 1/10W 5% 0603 SMD", Storage Location="PCB Assembly WS", Supplier="ECE Dept"
R3: library part RS_27K, "RES 27K OHM 1/10W 5% 0603 SMD", Storage Location="PCB Assembly WS", Supplier="ECE Dept"
R4: library part RS_300K, "RES 300K OHM 1/10W 5% 0603 SMD", Storage Location="PCB Assembly WS", Supplier="ECE Dept"
R5 R6: library part RS_47K, "RES 47.0K OHM 1/10W 5% 0603 SMD", Storage Location="PCB Assembly WS", Supplier="ECE Dept"
R7: library part RS_220K, "RES 3.3K OHM 1/10W 5% 0603 SMD", Storage Location="PCB Assembly WS", Supplier="ECE Dept"
R8: library part RT_1R, "RES 1R OHM 1/4W 5% 1206 SMD", Storage Location="PCB Assembly WS", Supplier="ECE Dept"
R9: library part RS_3K, "RES 3K OHM 1/10W 5% 0603 SMD", Storage Location="PCB Assembly WS", Supplier="ECE Dept"
R10: library part RS_2K, "RES 2K OHM 1/10W 5% 0603 SMD", Storage Location="PCB Assembly WS", Supplier="ECE Dept"
R11: library part RS_0R0, "RES 0.0 OHM 1/10W 5% 0603 SMD", Storage Location="PCB Assembly WS", Supplier="ECE Dept"
R12: library part RS_100K, "RES 100K OHM 1/10W 5% 0603 SMD", Storage Location="PCB Assembly WS", Supplier="ECE Dept"
R13: library part RS_10R, "RES 10 OHM 1/10W 5% 0603 SMD", Storage Location="PCB Assembly WS", Supplier="ECE Dept"
S1 S2: library part WS_EVQPNF05M, "Panasonic 6 x 3.5mm SMD Light Touch Switch Type SMD", Manufacturer=Panasonic, Supplier Part Number 1=2079481, Manufacturer PN=EVQPNF05M, PackageDescription="6.0 x 3.5 mm", Storage Location="PCB Assembly WS", Supplier="ECE Dept", Supplier 1=Farnell, Supplier 2=Digi-Key, Supplier Part Number 2=P13598SCT-ND
TP1 TP2 TP_3V3 TP_3V3RF TP_5V TP_BATT_OUT TP_CSN TP_DN TP_DP TP_GND TP_LED TP_MISO TP_ML_1 TP_ML_2 TP_MOSI TP_MR_1 TP_MR_2 TP_SPCK TP_STAT0 TP_VBUS: library part TP_1206, "Test-Point 3.3x1.6x2.1mm SMD", Manufacturer="Harwin Inc", Manufacturer Part Number=S1751-46R, Supplier Part Number 1=952-1478-2-ND, Mounting Type="Surface Mount", Storage Location=ProtoPlace, Supplier="ECE Dept", Supplier 1=Digi-Key, Supplier 2=Farnell, Supplier Part Number 2=1826282, Type="PC Test Point"
U1: library part SE_ATSAM4S16BA-MU, "IC MCU 32BIT 512KB FLASH 64LQFP", Manufacturer=Atmel, Package / Case=64-LQFP, Supplier Part Number 1=ATSAM4S8BA-ANRCT-ND, Voltage - Supply (Vcc/Vdd)="1.62 V ~ 3.6 V", Code_JEDEC=MO-220VMMD-3, ComponentLink1Description="Manufacturer URL", ComponentLink1URL=http://www.atmel.com/, ComponentLink2Description="SAM4S Series Datasheet", ComponentLink2URL=http://www.atmel.com/dyn/resources/prod_documents/11100.pdf, ComponentLink3Description="SAM4S Series Summary", ComponentLink3URL=http://www.atmel.com/dyn/resources/prod_documents/11100S.pdf, Connectivity="I²C, IrDA, Memory Card, SPI, SSC, UART/USART, USB", Core Processor="ARM® Cortex®-M4", Core Size=32-Bit, Data Converters="A/D 11x12b, D/A 2x12b", Manufacturer Part Number=ATSAM4S8BA-ANR, Number of I/O=47, PackageDescription="64-Pin Quad Flat No-Lead (QFN) Sawn, 9 x 9 x 1.0 mm Body, 0.5 mm Pitch, Exposed Pad", PackageReference=64PS, PackageVersion="revJ, Jul-2007", Packaging="Cut Tape (CT)", Peripherals="Brown-out Detect/Reset, DMA, POR, PWM, WDT", Program Memory Size="512KB (512K x 8)", Program Memory Type=FLASH, RAM Size="128K x 8", Speed=120MHz, Supplier 1=Digi-Key
U2: library part NRF24, "nRF24 SMD Module", Warning="No power planes near or under device"
U3 U4: library part SV_CAT6219-330TDGT3, "IC REG LIN 3.3V 500MA TSOT23-5", Base Part Number=CAT6219, Current - Output=500mA, Package / Case="SOT-23-5 Thin, TSOT-23-5", Supplier Device Package=TSOT-23-5, Supplier Part Number=CAT6219-330TDGT3CT-ND, Voltage - Input (Max)=5.5V, Voltage - Output (Min/Fixed)=3.3V, Voltage Dropout (Max)="0.5V @ 500mA", ComponentLink1Description=http://www.onsemi.com/pub/Collateral/CAT6219-D.PDF, ComponentLink1URL=http://www.onsemi.com/pub/Collateral/CAT6219-D.PDF, ComponentLink2Description="CAT6219 Datasheet", ComponentLink2URL=\\maxwell\elecapp\AltiumDesigner\Libraries\DatasheetsNew\ENCE461\CAT6219-D.PDF, Manufacturer Part Number=CAT6219-330TDGT3, Supplier=Digi-Key, Supplier 1=Digi-Key
U5: "1.8V - 5V level converter"
U6: library part ADP2302ARDZ-5.0-R7, "IC REG BUCK 5V 2A 8SOIC", Current - Output=2A, Frequency - Switching=700kHz, Supplier Part Number 1=ADP2302ARDZ-5.0-R7CT-ND, Voltage - Input (Max)=20V, Voltage - Output (Min/Fixed)=5V, ComponentLink1Description="ADP2302ARDZ-5.0 Datasheet", ComponentLink1URL=\\maxwell\elecapp\AltiumDesigner\Libraries\DatasheetsNew\ENCE461\ADP2302_2303.pdf, Manufacturer_Part_Number=ADP2302ARDZ-5.0-R7, Output Type=Fixed, Supplier 1=Digi-Key, Type=DEV, Vendor="Analog Devices Inc"
U7: "Dual H-Bridge Motor Driver 1.5A", ComponentLink1Description="DRV8833 Datasheet", ComponentLink1URL=\\maxwell\elecapp\AltiumDesigner\Libraries\DatasheetsNew\ENCE461\drv8833pwpr.pdf
Y1: library part XT_CRYSTAL_12MHz_18pF, "CRYSTAL 12MHZ 18PF 6X3.5mm SMD", ESR (Equivalent Series Resistance)="60 Ohm", Frequency Stability=±50ppm, Frequency Tolerance=±30ppm, Load Capacitance=18pF, Manufacturer="CTS-Frequency Controls", Manufacturer Part Number=406C35D12M00000, Operating Mode=Fundamental, Operating Temperature="-20°C ~ 70°C", Package / Case="4-SMD, No Lead (DFN, LCC)", Supplier Part Number 1=CTX855CT-ND, Frequency=12MHz, Height="0.047\" (1.20mm)", Mounting Type="Surface Mount", Size / Dimension="0.236\" L x 0.138\" W (6.00mm x 3.50mm)", Supplier 1=Digi-Key

## Via types
v1: diameter 1, hole 0.5, Top Layer to Bottom Layer, 61 vias
v2: diameter 1.27, hole 0.711, Top Layer to Bottom Layer, 1 vias
v3: diameter 2.2, hole 1.6, Top Layer to Bottom Layer, 1 vias
v4: diameter 2, hole 1.5, Top Layer to Bottom Layer, 1 vias

## Nets (pads, with @x,y where several pads share a name; then routed paths per layer and width w, separated by ;. In a path a pad name is that pad's centre, name@x,y a point inside that pad or via, vN(x,y) a via of type N, cw(c..) or ccw(c..) an arc to the next point about the centre after c; other vN are vias at no path point)
3V3: C5.2 C7.2 C11.2 C13.2 C15.2 C19.2 C23.2 DL1.2 DL2.2 H7.7 H7.8 H9.1 TP1.1 TP_3V3.1 U1.1 U1.7 U1.18 U1.45 U1.58 U3.5 U5.6 | length 35.2
  Top Layer w0.3: v1(14,46.8) C23.2 15.503,46.103 15.533,45.897 U5.6 ; v1(21.3,42.2) C19.2 21.342,39.95 21.357,39.675 U3.5 ; v1(23.4,63.5) C7.2 24.95,63.25 U1.18 ; C5.2 32,68.65 v1(32,68) 32,67.642 ccw(c32.3,67.642) 32.087,67.43 32.603,66.915 cw(c32.25,66.56) 32.75,66.56 U1.7 ; v1(33.15,52.7) 33.339,52.7 33.639,52.4 C11.2@34.55,52.4 ; DL1.2 34.57,40.13 v1(35.1,39.6) ; U1.45 34.225,54.45 34.225,53.025 34.8,52.45 C11.2 ; U1.1 v1(36.7,66.1) 36.955,66.815 C15.2 ; U1.58 38.85,60.75 cw(c38.85,60.25) 39.065,60.701 39.625,60.434 ccw(c39.754,60.705) 39.699,60.41 39.703,60.409 C13.2 41.211,60.3 41.511,60.6 v1(41.7,60.6) ; v1(38.1,44.7) 38.2,44.6 TP1.1 40.076,44.6 39.226,43.75 39.226,43.326 38.668,42.768 38.668,42.35 38.418,42.1 DL2.2 ; TP_3V3.1 v1(43.5,3.8)
3V3RF: C21.2 L1.2 TP_3V3RF.1 U4.5 | length 9.8
  Top Layer w0.8: L1.2 7.55,55.55 U4.5 8.95,53.55 C21.2 9.85,53.4 10.85,52.4 TP_3V3RF.1
5V: C18.2 C20.2 C22.2 C26.2 C27.2 L3.2 P3.1 R11.2 TP_5V.1 U3.1 U3.3 U4.1 U5.1 U6.5 | length 76.9
  Top Layer w0.3: R11.2 14.35,41.2 C22.2 15.57,41.899 15.57,41.901 U5.1
  Top Layer w0.4: C22.2 15.5,39.6 17.401,37.699 17.401,37.15 17.551,37 TP_5V.1@18.1,37
  Top Layer w0.6: 2.6,49.5 2.6,50.486 2.35,50.736 2.35,52.999 2.951,53.6 3.2,53.6 C20.2 3.999,53.632 4.076,53.625 U4.1 ; TP_5V.1 18.1,37 18.75,37 18.8,37.05 18.8,37.7 19.7,38.6 19.7,42.014 22.086,44.4 P3.1
  Top Layer w0.8: C18.2 21.173,35.293 21.208,35.432 U3.1 21.4,36.975 21.75,37.325 22.95,37.325 23.3,36.975 U3.3
  Top Layer w1: C27.2 16.556,27.35 ccw(c16.556,27.538) U6.5 16.689,28.739 C26.2 17.65,35.15 TP_5V.1 20,35.6 C18.2
  Top Layer w1.5: 2.6,49.5 2.6,36.294 6.594,32.3 L3.2 12.449,30.473 13.539,28.127 C27.2
BATT_IN: F1.1 H6.2 | length 2.3
  Top Layer w1.5: F1.1 13.424,6.3 13.522,6.202 13.898,6.202 H6.2
BATT_OUT: C9.2 C10.2 C24.2 C29.1 C30.2 D1.1 Q1.2 R4.2 TP_BATT_OUT.1 U6.2 U6.3 U7.12 | length 65.7
  Top Layer w0.4: U7.12 43.6,26.165 43.734,26.299 43.734,26.813 43.723,26.823 C29.1 45.9,27.4 C30.2
  Top Layer w0.8: C30.2 46.1,31.3 R4.2@46.2,31.4
  Top Layer w1: C9.2 Q1.2 ; U6.3 U6.2 21.446,25 C24.2
  Top Layer w1.5: Q1.2 6.45,10.95 7.481,13.373 C10.2 10.772,17.5 D1.1 11.7,17.725 11.975,18 13.8,18 14.4,18.6 20.3,18.6 23.9,22.2 23.9,24.5 26.806,24.5 33.706,31.4 R4.2@46.2,31.4
Bumper: H9.2 R12.2 U1.59 | length 29.2
  Top Layer w0.3: v1(35.6,62.6) 35.672,62.528 35.672,61.928 36.201,61.399 36.35,61.25 U1.59 ; v1(50.7,69.4) 53.04,69.4 H9.2
  Top Layer w0.6: H9.2 57.45,71.4 R12.2
  Bottom Layer w0.3: v1(35.6,62.6) 42.4,69.4 v1(50.7,69.4)
CE: U1.29 U2.3 | length 25.6
  Top Layer w0.3: U2.3 6.286,59.814 10.85,55.25 21.85,55.25 22.3,55.7 22.3,57.3 22.75,57.75 U1.29
CHANNEL_SELECT_0: H5.1 U1.3 | length 19.3
  Top Layer w0.3: U1.3 34.75,68.95 45,79.2 H5.1 H5.1@44.856,78.556
CHANNEL_SELECT_1: H4.1 U1.4 | length 15.9
  Top Layer w0.3: U1.4 34.25,71.75 39.6,77.1 H4.1
CHANNEL_SELECT_2: H3.1 U1.5 | length 13.7
  Top Layer w0.3: H3.1 33.75,79.05 U1.5
CHANNEL_SELECT_3: H1.1 U1.6 | length 15.9
  Top Layer w0.3: H1.1 27.8,76.245 33.25,70.795 U1.6
D_N: H2.2 R2.1 TP_DN.1 | length 15.6
  Top Layer w0.3: R2.1 45.05,58.7 45.373,59.023 46.78,59.023 46.88,59.123 49.4,59.123 50.05,59.773 50.677,59.773 51.65,58.8 TP_DN.1 53.15,58.8 54.123,59.773 55.16,59.773 55.385,59.998 H2.2@59.102,59.998 ; H2.2@59.602,59.998 H2.2
D_P: H2.3 R1.1 TP_DP.1 | length 15.6
  Top Layer w0.3: R1.1 45.05,59.9 45.373,59.577 46.55,59.577 46.65,59.677 49.17,59.677 49.82,60.327 50.677,60.327 51.65,61.3 TP_DP.1 53.15,61.3 54.123,60.327 54.931,60.327 55.156,60.552 H2.3@59.102,60.552 ; H2.3@59.602,60.552 H2.3
GND: C1.2 C2.1 C3.1 C4.1 C5.1 C6.1 C7.1 C8.1 C9.1 C10.1 C11.1 C12.1 C13.1 C14.1 C15.1 C17.1 C18.1 C19.1 C20.1 C21.1 C22.1 C23.1 C24.1 C26.1 C27.1 C28.1 C29.2 C31.1 D2.1 H1.2 H2.5 H2.6 H3.2 H4.2 H5.2 H6.1 H6.3 H7.5 H7.6 H8.3 P3.3 R5.1 R6.1 R7.1 R8.1 R12.1 S1.1 S2.1 TP_GND.1 U1.2 U1.17 U1.46 U1.60 U2.2 U3.2 U4.2 U5.2 U5.5 U6.7 U6.EPAD U7.3 U7.6 U7.13 | length 115.3
  Top Layer w0.3: U5.2 16.6,41.5 C22.1 v1(18.2,41.2) ; U5.5 16.694,45.898 16.718,46.102 C23.1 17.858,46.8 18.035,46.976 v1(18.224,46.976) ; v1(21.4,47.7) 21.534,47.834 21.854,47.834 P3.3 ; v1(22,60.3) C12.1 ; C7.1 v1(26.5,64.9) 26.5,63.81 cw(c26.415,63.81) U1.17 ; v1(27.7,42.35) S2.1 ; C6.1 C8.1 ; v1(30.4,70.9) v1@30.5,70.8 ; C8.1@30.5,69.5 v1@30.5,70.8 ; C5.1 30.789,70.7 30.689,70.8 v1@30.5,70.8 ; v1(32.6,3.8) TP_GND.1 ; U1.46 34.75,53.376 34.926,53.2 35.4,53.2 35.9,52.7 35.95,52.7 36.2,52.45 C11.1 v1(37.5,52.4) ; U1.2 cw(c35.75,65.525) 35.266,65.649 ccw(c34.975,65.723) 35.275,65.723 35.275,66.175 cw(c35.75,66.175) 35.592,66.623 35.619,66.65 35.65,66.65 35.8,66.8 C15.1 35.8,68.311 36.1,68.611 v1(36.1,68.8) ; U1.60 39.359,61.75 v1(39.409,61.7) C13.1 41.5,61.7 C4.1 ; C17.1 38,67.008 38.458,67.466 38.866,67.466 v1(39,67.6) ; 41.185,20.4 41.7,20.4 42.3,19.8 U7.3 ; C31.1 42.9,28.1 v1(43,28) ; v1(42.7,67.5) C3.1 ; U7.13 42.95,27.95 v1(43,28) ; C14.1 44.917,51.4 ccw(c44.917,52.083) v1(45.4,51.6) 45.601,51.6 ccw(c45.601,53.649) R8.1 ; U7.6 44.25,19.707 44.943,20.4 45.35,20.4 ; C29.2 43.622,28.122 43.122,28.122 v1(43,28) ; v1(50.7,56.9) 50.7,56.75 R6.1 ; C1.2 57.5,57.5 58.1,58.1 H2.6@59.624,58.1 ; v2(58.1,68.5) R12.1
  Top Layer w0.4: H2.5 H2.6@59.65,63.1
  Top Layer w0.5: v1(44.3,36.8) R7.1
  Top Layer w0.6: v1(3.5,51) 3.5,51.159 3.3,51.359 C20.1 3.995,52.435 4.08,52.451 U4.2 ; v1(9.1,50.7) C21.1 ; U3.2 22.374,35.425 22.378,35.3 C18.1 22.5,34.6 v1(23.8,34.6) ; v1(58.6,24) S1.1
  Top Layer w0.8: U2.2 5.014,60.966 cw(c2.474,60.966) 4.27,59.17 C2.1 v1(5.5,59.1) ; C28.1 5.45,44.8 5.75,44.8 6.55,45.6 9.59,45.6 9.77,45.78 H8.3 ; C19.1 23.65,40.7 v1(24.4,40.7) ; v1(39.5,21.8) 40.9,20.4 41.185,20.4 ; 45.35,20.4 45.6,20.4 v1(46.9,21.7)
  Top Layer w1: C10.1 2.422,13.336 v1(1.7,10.5) 2.754,10.314 C9.1 ; C27.1 16.17,24.65 ccw(c16.17,25.384) U6.7 18.425,24.865 19,25.44 v4(19,25.5) ; C26.1 v1(23.8,29.7) C24.1
  Top Layer w1.5: D2.1 v1(6.2,23.6) ; R5.1 11.51,8.64 H6.1 ; H2.6@62.35,57.1 H2.6@62.35,59.6 ; H2.6@62.35,61.6 H2.6@62.35,64.1
IDLE_EN: U1.31 U4.3 U7.1 | length 75.3
  Top Layer w0.3: U4.3 5.625,51.65 7.425,49.85 18.45,49.85 25.35,56.75 U1.31 27.524,56.75 27.7,56.574 27.7,54.543 26.1,52.943 26.1,36.726 26.166,36.66 26.166,36.334 v1(26.3,36.2) ; v1(36.8,19) U7.1
  Bottom Layer w0.3: v1(26.3,36.2) 26.3,26.3 33.6,19 v1(36.8,19)
IRQ: U1.30 U2.8 | length 16
  Top Layer w0.3: U2.8 12.643,61.333 12.943,61.033 13.367,61.033 v1(13.9,60.5) ; v1(24.298,56.9) 24.432,57.034 24.634,57.034 24.85,57.25 U1.30
  Bottom Layer w0.3: v1(13.9,60.5) 17.678,56.722 23.772,56.722 23.816,56.766 24.164,56.766 v1(24.298,56.9)
LED_DATA: U1.32 U5.4 | length 14.8
  Top Layer w0.3: U5.4 26.475,54.025 U1.32
LED_OUTPUT: H8.2 U5.3 | length 9
  Top Layer w0.6: H8.2 10.284,43.24 11.044,44 17.199,44 17.55,43.649 U5.3
LED_POW: R4.1 R7.2 TP_LED.1 U1.10 | length 46.5
  Top Layer w0.3: U1.10 31.25,63.85 v1(31.3,63.8)
  Top Layer w0.5: v1(45.8,40.5) 47.6,38.7 TP_LED.1 ; R4.1 47.9,35.95 R7.2 47.05,37.5 47.073,37.523 47.223,37.523 TP_LED.1 ; TP_LED.1@48.7,38.4 TP_LED.1
  Bottom Layer w0.3: v1(31.3,63.8) 32.25,62.85 32.25,62.148 32.7,61.698 32.7,53.602 32.15,53.052 32.15,49.45 36.05,45.55 40.75,45.55 v1(45.8,40.5)
MISO: TP_MISO.1 U1.27 U2.7 | length 18.7
  Top Layer w0.3: U2.7 11.371,62.9 11.671,63.2 14,63.2 16.1,61.1 TP_MISO.1 17.6,59.4 24.8,59.4 25.45,58.75 U1.27
MOSI: TP_MOSI.1 U1.22 U2.6 | length 19.8
  Top Layer w0.3: U2.6 10.1,62.9 11.2,64 16.5,64 19.7,60.8 20.15,61.25 U1.22
MOTOR_IN_L1: TP_ML_1.1 U1.20 U7.16 | length 49.5
  Top Layer w0.3: U1.20 27.55,62.25 28.126,61.674 28.126,61.464 28.3,61.289 v1(28.3,61.1) ; v1(34,25) TP_ML_1.1 ; TP_ML_1.1@37.5,25 40.6,25 U7.16
  Bottom Layer w0.3: v1(28.3,61.1) 28.434,60.966 28.434,60.64 28.8,60.274 28.8,27.2 31,25 v1(34,25)
MOTOR_IN_L2: TP_ML_2.1 U1.19 U7.15 | length 50.1
  Top Layer w0.3: U1.19 28.158,62.75 28.46,62.449 v1(28.649,62.449) ; v1(34.6,27.4) 34.7,27.5 TP_ML_2.1 ; TP_ML_2.1@37.8,27.4 38.224,26.976 39.524,26.976 40.55,25.95 41.474,25.95 41.65,25.774 U7.15
  Bottom Layer w0.3: v1(28.649,62.449) 28.838,62.449 29.059,62.228 29.172,62.228 30.251,61.149 30.251,29.249 32.1,27.4 v1(34.6,27.4)
MOTOR_IN_R1: TP_MR_1.1 U1.13 U7.9 | length 58.2
  Top Layer w0.3: U1.13 29.75,64.239 29.9,64.089 v1(29.9,63.9) ; U7.9 45.889,24.261 45.928,24.3 TP_MR_1.1 v1(51.4,24.3)
  Bottom Layer w0.3: v1(29.9,63.9) 29.875,63.875 29.875,63.132 31.649,61.358 31.649,47.951 43.65,35.95 44.65,35.95 53.1,27.5 53.1,26 v1(51.4,24.3)
MOTOR_IN_R2: TP_MR_2.1 U1.16 U7.10 | length 57.3
  Top Layer w0.3: U1.16 28.25,63.85 v1(28.3,63.8) ; U7.10 44.9,25.25 45.165,25.569 cw(c45.55,25.25) 45.419,25.733 46.66,26.069 ccw(c46.516,26.6) 46.676,26.074 TP_MR_2.1@49.474,26.927 ; v1(48.9,29.4) 48.914,29.386 48.914,28.671 49.44,28.145 49.44,27.36 49.774,27.026 TP_MR_2.1
  Bottom Layer w0.3: v1(28.3,63.8) 28.489,63.8 28.761,63.528 28.772,63.528 31.149,61.151 31.149,43.551 32.3,42.4 32.3,39.674 34.874,37.1 38.5,37.1 46.3,29.3 v1@48.9,29.3
MOTOR_OUT_L1: P1.1 U7.2 | length 7.8
  Top Layer w0.4: 39.3,17.8 41.15,17.8 ccw(c41.15,18.2) 41.53,18.076 41.573,18.206 ccw(c40.114,18.686) 41.65,18.686 U7.2
  Top Layer w1.5: P1.1 37.1,14.548 cw(c39.64,14.548) 37.844,16.344 39.3,17.8
MOTOR_OUT_L2: P1.2 U7.4 | length 6.3
  Top Layer w0.4: 42.1,16.6 42.95,17.45 U7.4
  Top Layer w1.5: P1.2 42.1,16.6
MOTOR_OUT_R1: P2.1 U7.7 | length 8
  Top Layer w0.4: U7.7 cw(c44.6,18.735) 45,18.735 45,18.35 ccw(c45.55,18.35) 45.55,17.8 46.7,17.8
  Top Layer w1.5: 46.7,17.8 46.86,17.8 cw(c46.86,15.26) 49.4,15.26 P2.1
MOTOR_OUT_R2: P2.2 U7.5 | length 6.2
  Top Layer w0.4: U7.5 43.6,17.4 44.4,16.6
  Top Layer w1.5: 44.4,16.6 P2.2
NetC2_2: C2.2 R13.1 U2.1 | length 4.3
  Top Layer w0.8: R13.1 2,58.481 2.569,59.05 2.8,59.05 C2.2 3.079,59.781 3.198,60.071 U2.1
NetC3_2: C3.2 U1.62 Y1.3 | length 11
  Top Layer w0.3: U1.62 38.55,62.75 39.238,63.438 39.238,63.983 40.105,64.85 41.995,64.85 43.045,65.9 Y1.3 45.4,66 C3.2
NetC4_2: C4.2 U1.61 Y1.1 | length 6.8
  Top Layer w0.3: U1.61 38.757,62.25 39.057,62.55 39.95,62.55 Y1.1 41.7,63.5 C4.2
NetC6_2: C6.2 C8.2 U1.8 U1.12 | length 9.5
  Top Layer w0.3: U1.12 30.25,66.56 29.91,66.9 29,66.9 28.65,67.25 28.65,67.979 ccw(c28.479,67.979) C6.2 28.65,68.1 C8.2 30.4,67.4 31,66.8 32.01,66.8 32.25,66.56 U1.8
NetC12_2: C12.2 C14.2 L2.2 U1.24 U1.54 | length 23.3
  Top Layer w0.3: C12.2 ccw(c24.821,60.421) 24.821,60.25 U1.24 29.15,60.25 30.65,58.75 U1.54 38.791,58.75 39.291,58.25 40.15,58.25 L2.2 C14.2
NetC16_1: C16.1 R8.2 | length 2.5
  Top Layer w0.3: R8.2 49.75,53.996 cw(c50.604,53.996) C16.1
NetC16_2: C16.2 C17.2 L2.1 U1.64 | length 26.6
  Top Layer w0.3: v1(33.1,62.5) 34.35,63.75 U1.64 37.689,64.113 37.716,64.172 C17.2 ; v1(46.8,56.5) L2.1 C16.2
  Bottom Layer w0.3: v1(33.1,62.5) 40,55.6 41.7,55.6 42.7,56.6 46.7,56.6 v1(46.8,56.5)
NetC25_1: C25.1 D2.2 L3.1 U6.8 | length 19.9
  Top Layer w0.4: C25.1@18.172,22.112 ccw(c18.2,22.14) C25.1
  Top Layer w1.5: L3.1 3.819,30.752 9.006,25.093 D2.2 11.824,23.467 11.827,23.466 cw(c11.687,21.973) 12.163,23.395 12.748,23.199 ccw(c13.05,24.1) 13.013,23.151 16.666,23.009 C25.1@18.172,22.112
NetC25_2: C25.2 U6.1 | length 1.9
  Top Layer w0.8: C25.2 20.216,22.459 20.8,22.8
  Top Layer w1.5: 20.8,22.8 21.1,23.2
NetC28_2: C28.2 H8.1 R11.1 | length 9.8
  Top Layer w0.8: C28.2 8.75,41.95 H8.1 11.25,39.45 R11.1
NetC30_1: C30.1 U7.11 | length 5.7
  Top Layer w0.4: U7.11 44.25,25.967 44.883,26.6 46.516,26.6 46.816,26.9 47.5,26.9 C30.1
NetC31_2: C31.2 U7.14 | length 2.4
  Top Layer w0.3: C31.2 42.3,26 U7.14
NetD1_2: D1.2 Q1.1 R5.2 | length 6.3
  Top Layer w1.5: Q1.1 8.356,10.206 cw(c10.152,8.41) 10.152,10.95 R5.2 10.956,11.006 ccw(c9.16,12.802) 11.7,12.802 D1.2
NetDL1_1: DL1.1 R9.1 | length 2.4
  Top Layer w0.3: DL1.1 34.5,43.77 R9.1
NetDL2_1: DL2.1 R10.1 | length 2.6
  Top Layer w0.3: R10.1 36.8,44.55 DL2.1
NetF1_2: F1.2 Q1.3 | length 2.5
  Top Layer w1.5: Q1.3 7.4,7.75 F1.2
NetL1_1: L1.1 R13.2 | length 1.7
  Top Layer w0.8: R13.2 3.3,56.25 3.45,56.4 L1.1@3.45,56.55
NetR1_2: R1.2 U1.57 | length 6.8
  Top Layer w0.3: U1.57 38.85,60.25 39.85,59.25 41.35,59.25 41.593,59.493 42.593,59.493 42.807,59.707 43.35,59.707 43.55,59.907 R1.2
NetR2_2: R2.2 U1.56 | length 6.8
  Top Layer w0.3: U1.56 38.55,59.75 39.55,58.75 41.557,58.75 41.8,58.993 43.257,58.993 43.55,58.7 R2.2
NetTP2_1: TP2.1 U1.55 | length 20.8
  Top Layer w0.3: v1(34.499,59.899) 34.499,59.71 34.769,59.439 34.769,59.426 34.945,59.25 U1.55 ; v1(37.3,49.8) 40,47.1 TP2.1
  Bottom Layer w0.3: v1(34.499,59.899) 34.499,59.872 34,59.373 34,50.7 34.9,49.8 v1(37.3,49.8)
NPCS0: TP_CSN.1 U1.28 U2.4 | length 21.2
  Top Layer w0.3: U2.4 7.797,61.16 7.797,59.903 9.7,58 TP_CSN.1 12.65,58.25 U1.28
nRST: H7.1 S1.2 U1.39 | length 43
  Top Layer w0.3: U1.39 31.25,52.757 32.307,51.7 32.707,51.7 32.907,51.5 40.246,51.5 55.501,36.245 56.517,36.245 57.471,37.199 58.349,37.199 H7.1
  Top Layer w0.5: H7.1 58.6,37.39 S1.2
Servo1: P3.2 U1.33 | length 9.6
  Top Layer w0.3: v1(27.5,52.9) 27.689,52.9 27.956,53.167 27.977,53.167 28.25,53.44 U1.33
  Bottom Layer w0.3: P3.2 23.54,46.98 23.54,47.94 27.5,51.9 v1(27.5,52.9)
SLEEP: S2.2 U1.35 | length 6.5
  Top Layer w0.3: S2.2 27.7,51.3 28.2,51.8 29.25,52.85 U1.35
SPCK: TP_SPCK.1 U1.21 U2.5 | length 21.7
  Top Layer w0.3: U2.5 8.829,62.9 10.529,64.6 21.098,64.6 23.048,62.65 23.05,62.65 23.1,62.6 24.6,62.6 25.45,61.75 U1.21 ; TP_SPCK.1 19.8,65.8 TP_SPCK.1@19.8,65.3
STAT0: R9.2 TP_STAT0.1 U1.37 | length 22.3
  Top Layer w0.3: U1.37 30.25,52.22 34.5,47.97 R9.2 35.9,44.75 35.9,40.002 37.9,38.002 TP_STAT0.1
STAT1: R10.2 U1.38 | length 11
  Top Layer w0.3: U1.38 30.75,53.44 30.75,52.55 32.1,51.2 32.5,51.2 36.7,47 R10.2
SWCLK: H7.2 U1.53 | length 31.4
  Top Layer w0.3: U1.53 36.376,58.25 36.2,58.074 36.2,56.253 42.303,50.15 44.178,50.15 55.868,38.461 55.868,37.582 H7.2
SWDIO: H7.4 U1.51 | length 26.9
  Top Layer w0.3: U1.51 38.65,57.25 38.9,57 38.9,54.955 43.205,50.65 45.34,50.65 H7.4
USB_DETECT: R3.1 R6.2 U1.43 | length 25.6
  Top Layer w0.3: U1.43 33.25,55.51 34.04,56.3 v1(35.2,56.3) ; v1(51.6,51.9) R6.2 R3.1
  Bottom Layer w0.3: v1(35.2,56.3) 39.05,52.45 45.752,52.45 46.302,51.9 v1(51.6,51.9)
VBUS: C1.1 H2.1 R3.2 TP_VBUS.1 | length 11.5
  Top Layer w0.3: TP_VBUS.1@56.3,54.1 54.75,55.65 R3.2 55,57.25 55,58.4 55.726,59.126 56.474,59.126 C1.1 56.7,59.3 H2.1@59.15,59.3
pads on no net: H2.4 H7.3 H7.9 H7.10 MT1.1 MT2.1 MT3.1 U1.9 U1.11 U1.14 U1.15 U1.23 U1.25 U1.26 U1.34 U1.36 U1.40 U1.41 U1.42 U1.44 U1.47 U1.48 U1.49 U1.50 U1.52 U1.63 U3.4 U4.4 U6.4 U6.6 U7.8 U7.17 Y1.2 Y1.4
copper on no net:
  other v3: 43.275,21.8

## Polygon pours and split planes (outlines as drawn)
GND on Ground Plane (split plane): 63.371,0.729 0.629,0.729 0.629,65.2 18.4,65.2 18.4,70.837 26.076,84.271 63.371,84.271
3V3 on Power Plane (split plane): 63.271,0.729 0.729,0.729 0.729,65.2 18.4,65.2 18.4,70.737 26.057,84.271 63.271,84.271

## Other copper
Ground Plane (plane layer: these items are gaps in the copper):
  pour cut-out: 26.35,84.75 16.55,84.85 18.05,72.15 17.95,70.05
  pour cut-out: 0.4,84.6 0.4,65.2 18.4,65.2 18.4,84.6
  lines w0.254: 0.5,0.6 63.5,0.6 63.5,84.4 0.5,84.4 0.5,0.6
Power Plane (plane layer: these items are gaps in the copper):
  pour cut-out: 26.3,84.7 17.7,69.5 17.6,84.5 17.5,84.6
  pour cut-out: 0.4,84.6 18.4,84.6 18.4,65.2 0.4,65.2
  lines w0.254: 63.3,0.6 0.6,0.6 0.6,84.4 63.4,84.4 63.4,0.6

## Silkscreen, mask and mechanical layers (free items; w line width, h text height)
Top Overlay:
  text "Group 26" at 54.35,19.017 h0.8
  text "Dominic McNulty" at 51.55,17.117 h0.8
  text "-" at 5.15,15.95 h0.8 r180
  text "Conner Horn" at 52.75,15.35 h0.8
  text "Charlie Horne" at 52.15,13.65 h0.8
  text "+" at 5.55,13.417 h0.8
  text "Cade Hinman" at 53.45,11.95 h0.8
  text "-" at 28,7.9 h2
  text "+" at 28.1,5.267 h2
  text "-" at 28.1,2.4 h2
Board Outline:
  the board outline again, w0.254

## Dimensions
0,86 to 64,86 on Mechanical 1
65,85 to 65,0 on Mechanical 1

## Text inside footprints (layer, text, board x,y; h text height)
H1: Top Overlay "1" at 28.2,74.9 h1.52 r90
H2: Mechanical 1 "PCB Edge" at 64.62,58.45 h0.52 r90
H3: Top Overlay "1" at 34,74.9 h1.52 r90
H4: Top Overlay "1" at 40,74.9 h1.52 r90
H5: Top Overlay "1" at 45.9,74.9 h1.52 r90
H7: Top Overlay "9" at 59.32,48.78 h1.5 r90; Top Overlay "10" at 56.78,48.78 h1.5 r90; Top Overlay "1" at 59.32,35.72 h1.5 r90; Top Overlay "2" at 56.78,35.22 h1.5 r90
H9: Top Overlay "1" at 52.9,67.1 h1.52 r90
U2: Top Overlay "NO GND/ / POWER / PLANES / UNDER / OR NEARBY" at 3.843,66.675 h1.2
U6: Mechanical 13 "*" at 20.93,24.344 h1.27 r180